# Altium PCB PCB1.PcbDoc
Units mil, origin at the board's own origin, x right, y up, seen from the top; angles counter-clockwise.
Board outline 767.9 x 856.49 mil, 2 copper layers (Top Layer, Bottom Layer), stack 61.756 mil thick; 13 components, 7 nets, 32 pads, 4 vias.
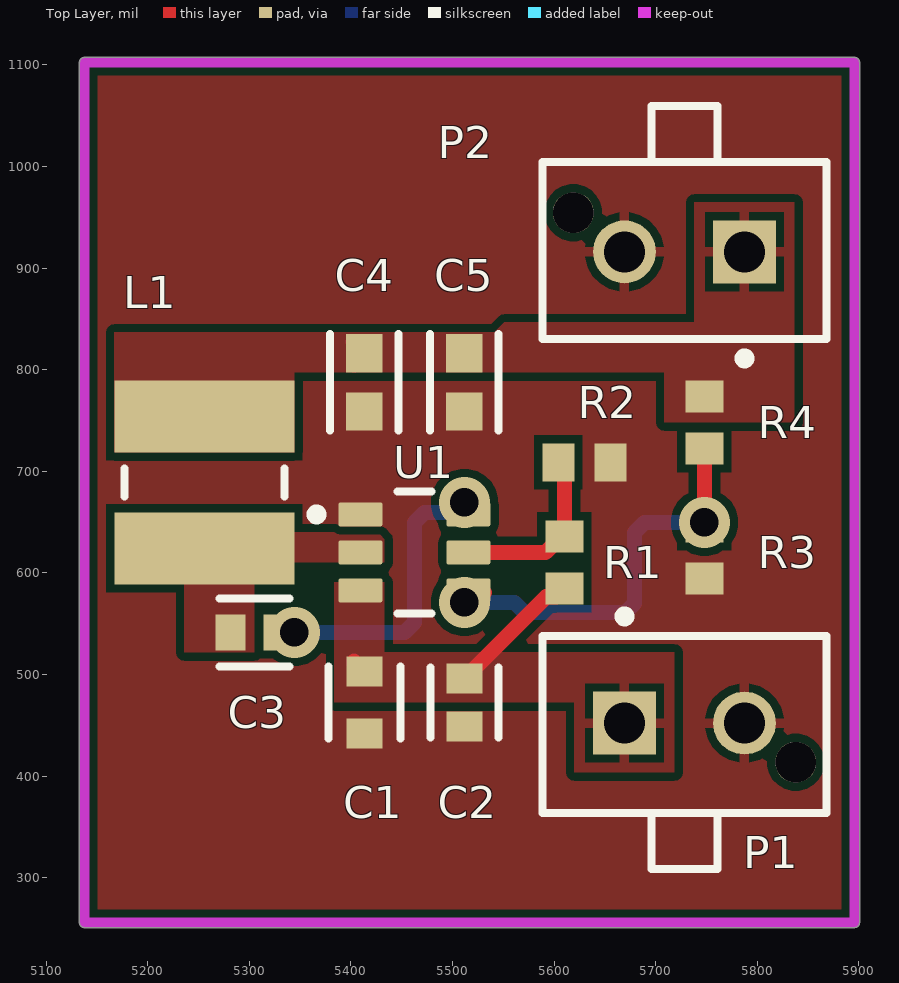
[diagram p0: Top Layer view]
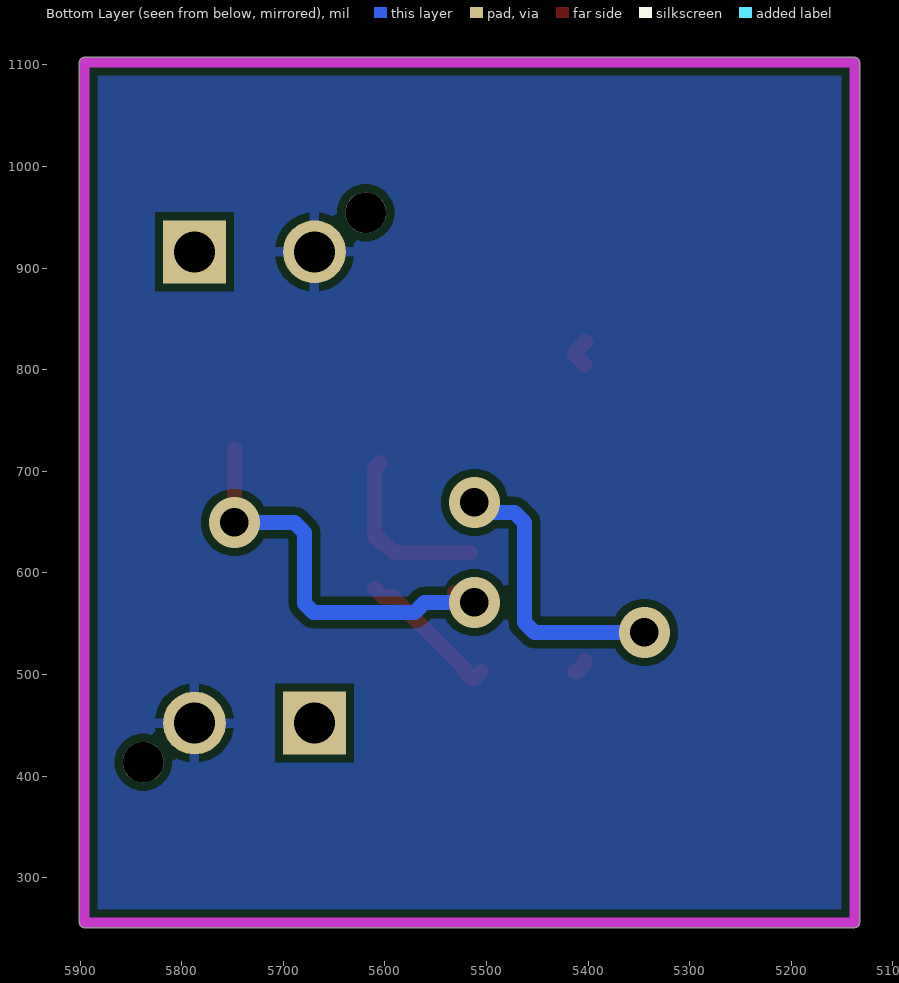
[diagram p1: Bottom Layer view, seen from below]
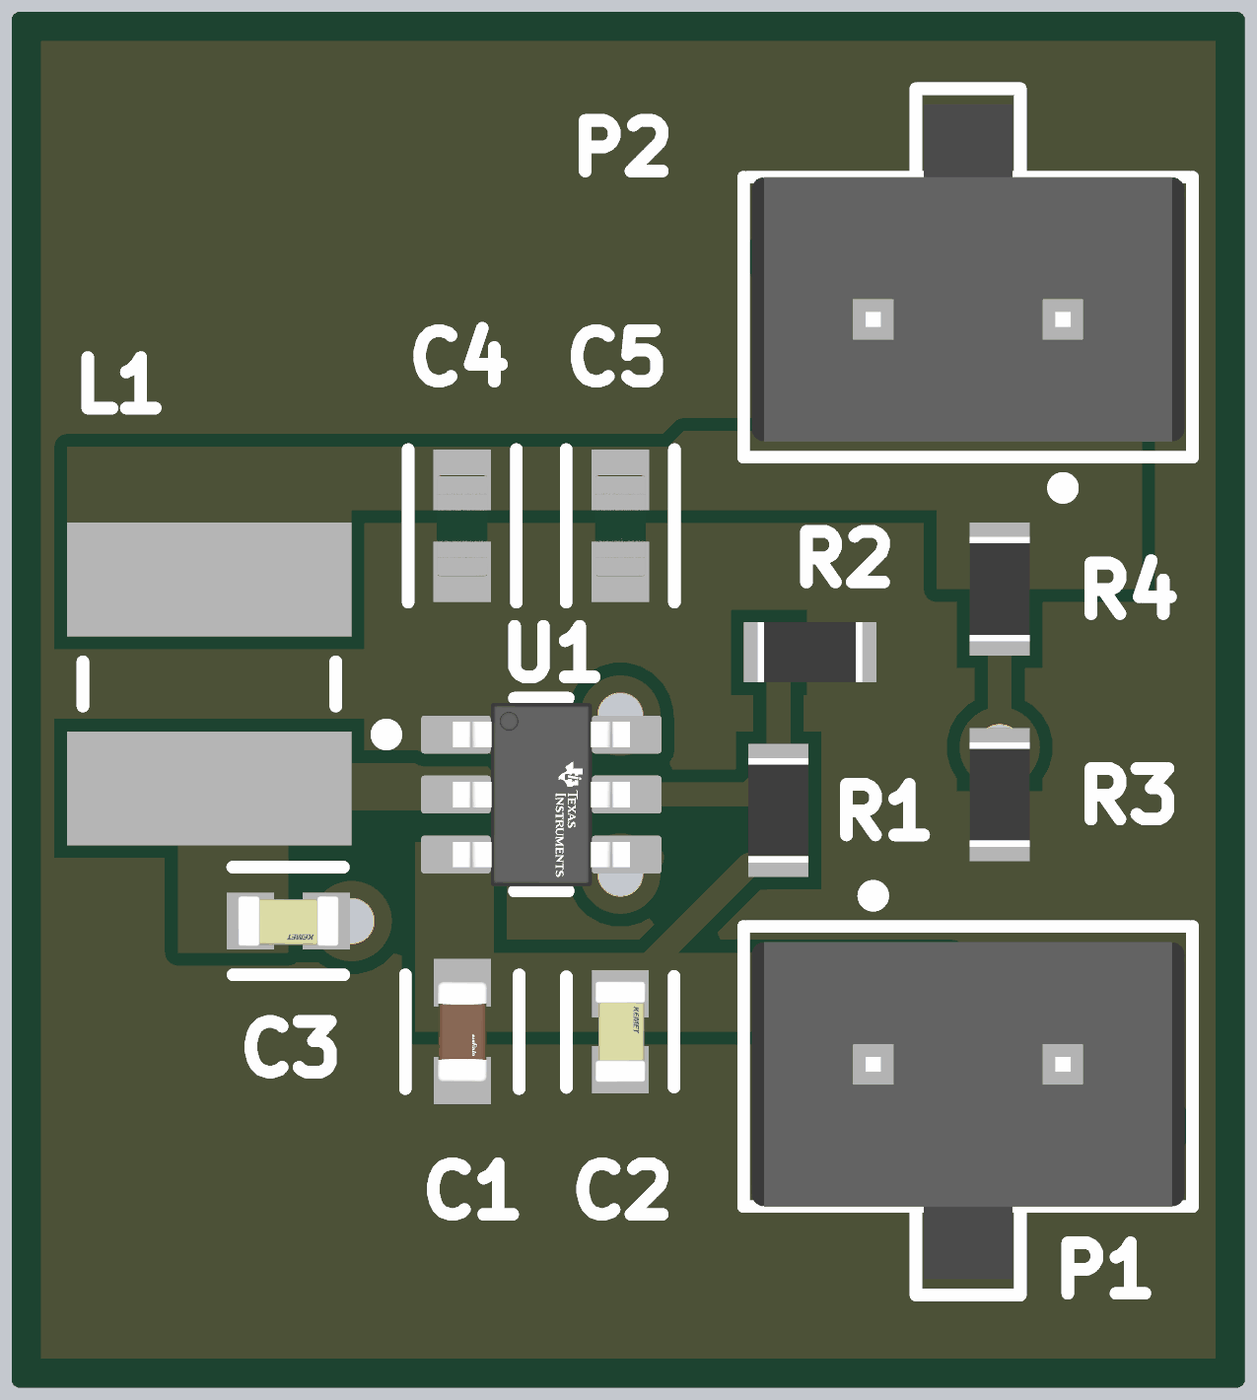
[diagram p2: 3D render of the assembled board from above, using the file's embedded part models]

## Layer stack, top to bottom
Top Solder: solder mask 1, SM-001, Dk 4
Top Layer: signal copper 1.378
Dielectric 1: core 59, Core-043, Dk 4.3
Bottom Layer: signal copper 1.378
Bottom Solder: solder mask 1, SM-001, Dk 4

## Board outline
5132.78,255.91 ccw(c5137.8,255.91) 5137.8,250.89 5895.67,250.89 ccw(c5895.67,255.91) 5900.68,255.91 5900.68,1102.36 ccw(c5895.67,1102.36) 5895.67,1107.38 5137.8,1107.38 ccw(c5137.8,1102.36) 5132.78,1102.36

## Design rules (kind name [scope] priority, off if disabled: settings)
BoardOutlineClearance [All] p1: gap=7.87 ignorepadtopadclearanceinfootprint=FALSE except(15.75: Arc-SplitBarrior Arc-SplitContinuation Track-SplitBarrior Track-SplitContinuation SMDPad-SplitBarrior SMDPad-SplitContinuation THPad-SplitBarrior THPad-SplitContinuation Via-SplitBarrior Via-SplitContinuation Fill-SplitBarrior Fill-SplitContinuation Poly-SplitBarrior Poly-SplitContinuation Region-SplitBarrior Region-SplitContinuation Text-SplitBarrior Text-SplitContinuation)
Clearance [All] p1: gap=3.94 ignorepadtopadclearanceinfootprint=FALSE except(5.91: Arc-Text Track-Text SMDPad-Text THPad-Text Via-Text Fill-Text Poly-Text Region-Text Text-Text; 7.87: Arc-Poly Arc-Hole Track-Poly Track-Hole SMDPad-Poly SMDPad-Hole THPad-Poly THPad-Hole Via-Poly Via-Hole Fill-Poly Fill-Hole Poly-Poly Poly-Hole Region-Hole Text-Hole)
ComponentClearance [All] p1: gap=9.84 collisioncheckmode=3 verticalgap=9.84 showdistances=TRUE donotcheckwithout3dbody=TRUE
DiffPairsRouting [All] p1: maxlimit=8 minlimit=8 mostfreqgap=8 toplayer_minwidth=5.7 toplayer_maxwidth=5.7 toplayer_prefwidth=5.7 bottomlayer_minwidth=5.7 bottomlayer_maxwidth=5.7 bottomlayer_prefwidth=5.7 maxuncoupledlength=500
HoleSize [All] p1: absolutevalues=TRUE maxlimit=248.03 minlimit=7.87 maxpercent=80.000 minpercent=20.000
MinimumAnnularRing MinimumAnnularRingPad [Not(IsVia)] p1: minimumring=9.84
MinimumAnnularRing MinimumAnnularRingVia [IsVia] p2: minimumring=3.94
MinimumSolderMaskSliver [All] p1: minsoldermaskwidth=1.01
PasteMaskExpansion [All] p1: expansion=0 percent=-30.000000
PlaneConnect [All] p1: planeconnectstyle=Direct reliefexpansion=20 reliefentries=4 reliefconductorwidth=10 reliefairgap=10
PolygonConnect PolygonConnect_1 [All] p1: thpad.connectstyle=Relief thpad.reliefconductorwidth=9.84 thpad.reliefentries=4 thpad.polygonreliefangle="90 Angle" thpad.airgapwidth=7.87 smdpad.connectstyle=Direct smdpad.reliefconductorwidth=9.84 smdpad.reliefentries=4 smdpad.polygonreliefangle="90 Angle" smdpad.airgapwidth=7.87 via.connectstyle=Direct via.reliefconductorwidth=20 via.reliefentries=4 via.polygonreliefangle="90 Angle" via.airgapwidth=10
RoutingCorners [All] p1: cornerstyle=Round minsetback=100 maxsetback=100
RoutingVias [All] p1: holewidth=11.81 width=19.68 viastyle="Through Hole" minholewidth=11.81 minwidth=19.68 maxholewidth=248.03 maxwidth=393.7
SilkToSilkClearance [All] p1: silktosilkclearance=3.94
SilkToSolderMaskClearance [IsPad] p1: minsilkscreentomaskgap=5.91 clearancetoexposedcopper=TRUE
SolderMaskExpansion SolderMaskExpansion_1 [IsVia] p1: expansion=4 istentingtop=TRUE
SolderMaskExpansion [All] p2: expansion=0 istentingtop=FALSE
SupplyNets "Schematic Supply Nets_3" [InNet('VOUT')] p1: voltage=0.000
SupplyNets "Schematic Supply Nets_2" [InNet('VIN')] p2: voltage=0.000
SupplyNets "Schematic Supply Nets_1" [InNet('GND')] p3: voltage=0.000
Width [All] p1: maxlimit=393.7 minlimit=3.94 preferedwidth=5.91
21 further rules are at their usual default settings.

## Components (designator, comment, footprint, x,y, rotation, side; value= is the part's Value field where it differs from the comment)
C1 "10μF" FP-GRM188-0_2-MFG 5413.39,472.44 r270 top
C2 "0.1μF" FP-C0603C-CF-MFG 5511.81,472.44 r270 top value="0.10 μF"
C3 "0.1μF" FP-C0603C-CF-MFG 5305.12,541.34 r180 top value="0.10 μF"
C4 "22μF" FP-CL10-IPC_B 5413.39,787.4 r270 top
C5 "22μF" FP-CL10-IPC_B 5511.81,787.4 r270 top
L1 "SDR0403-3R3ML" BOUR-SDR0403-2_V 5255.91,688.98 r90 top
P1 "216571-1002" FP-216571-1002-MFG 5728.35,423.23 r180 top
P2 "216571-1002" FP-216571-1002-MFG 5728.35,944.88 r0 top
R1 "47kΩ" RESC1609X50X30NL8T20 5610.24,610.24 r270 top
R2 "10kΩ" RESC1609X50X30NL8T20 5629.92,708.66 r180 top
R3 "10kΩ" RESC1609X50X30NL8T20 5748.03,620.08 r90 top
R4 "54.9kΩ" RESC1609X50X30NL8T20 5748.03,748.03 r270 top
U1 "TPS563208DDCR" FP-DDC0006A-MFG 5462.6,620.08 r0 top

## Footprints (in the part's own frame and the unit in brackets; to place one, negate y for a bottom-side part, rotate by r counter-clockwise, add the part's x,y. Pads: shape width x height; smd on the part's side, far side on the other; paste and mask are expansions set on the pad)
BOUR-SDR0403-2_V [mm] "SMD, 2-Leads, Dia 4.5mm, Height 3.5mm"
  rect 1.8x4.5 smd: 1(-1.65,0) 2(1.65,0)
  silkscreen extent -0.35,-2 0.35,2, body extent -2.25,-2 2.25,2, height 3.5
FP-216571-1002-MFG [mm]
  rect 1.57x1.57 hole 1.02 paste-2539.97 mask+0: 1(1.5,-0.735)
  round 1.57 hole 1.02 paste-2539.97 mask+0: 2(-1.5,-0.735)
  round 1.02 hole 1.02 unplated paste-2539.97 mask+0: ""(-2.78,0.245)
  silkscreen extent -3.55,-3.52 3.55,2.92, body extent -3.65,-3.02 3.65,3.02, height 0.25
FP-C0603C-CF-MFG [mm]
  rect 0.75x0.9 smd paste+0 mask+0: 1(-0.6,0) 2(0.6,0)
  silkscreen extent -0.87,-0.85 0.88,0.85, body extent -1.2,-0.6 1.2,0.6, height 0.25
FP-CL10-IPC_B [mil]
  rect 37.72x35.91 smd paste+0 mask+0: 1(-28.62,0) 2(28.62,0)
  silkscreen extent -47,-34 47,34, body extent -57,-28 57,28, height 10
FP-DDC0006A-MFG [mm]
  rrect17% 1.1x0.6 smd paste+0 mask+0: 1(-1.35,0.95) 2(-1.35,0) 3(-1.35,-0.95) 4(1.35,-0.95) 5(1.35,0) 6(1.35,0.95)
  silkscreen extent -2.57,-1.53 0.42,1.53, body extent -2,-1.63 2,1.63, height 0.25
FP-GRM188-0_2-MFG [mm]
  rect 0.75x0.9 smd paste+0 mask+0: 1(-0.775,0) 2(0.775,0)
  silkscreen extent -0.9,-0.9 0.9,0.9, body extent -1.25,-0.6 1.25,0.6, height 0.25
RESC1609X50X30NL8T20 [mm] "Chip Resistor, 2-Leads, Body 1.65x0.95mm, IPC Medium Density"
  rect 0.8x0.95 smd: 1(-0.65,0) 2(0.65,0)
  body extent -0.82,-0.48 0.82,0.48, height 0.5

## Part data
C1: library part CMP-2006-02520-2, "Chip Multilayer Ceramic Capacitors for General Purpose, 0603, 10uF, X5R, 15%, 20%, 25V", Case Code (Imperial)=0603, Case Code (Metric)=1608, Dielectric=X5R, Max Operating Temperature=85°C, Min Operating Temperature=-55°C, Package Quantity=1, Resistor Type=Ceramic, Tolerance=20%, Voltage=25V, Case/Package=0603, Depth=0.8mm, Height=0.8mm, Lead Free="Lead Free", Length=1.6mm, Mount="Surface Mount", Number of Pins=2, Packaging="Tape and Reel", REACH SVHC="No SVHC", Termination=SMD/SMT, Thickness=0.031inch, Voltage Rating=25V, Voltage Rating (DC)=25V, Weight=0.000222oz, Width=0.031inch
C2 C3: library part CMP-2006-03057-2, "CAP CER 0.1UF 25V X7R 0603", Capacitance="0.10 μF", Manufacturer=KEMET, Manufacturer Part Number=C0603C104K3RACTU, Package=C0603C-CF, Temperature="-55°C to +125°C", Temperature Characteristic=X7R, Temperature Coefficient=30ppm/°C, Temperature Range High=+125°C, Temperature Range Low=-55°C, Tolerance=10%, Voltage Rating="25 V", Automotive=Yes, Automotive Grade="Grade 1", Category=Cap, ComponentLink2Description=Datasheet, ComponentLink2URL=https://api.kemet.com/component-edge/download/datasheet/C0603C100J5GACAUTO.pdf, Device Class L1="Passive Components", Device Class L2=Capacitors, Device Class L3="Ceramic Capacitors", Digikey Description="CAP CER 0.1UF 25V X7R 0603", Height=0.87mm, Lead Free=Yes, Material=Ceramic, Mouser Description="Multilayer Ceramic Capacitors MLCC - SMD/SMT 25volts 0.1uF X7R 10%", Octopart=https://octopart.com/c0603c104k3ractu-kemet-127541, RoHS=TRUE
C4 C5: library part CMP-13271-002755-1, "Cap Ceramic 22uF 16V X5R ±20% Pad SMD 0603 +85°C T/R", Capacitance=22uF, Case Code (Imperial)=0603, Case Code (Metric)=1608, Max Operating Temperature=85°C, Min Operating Temperature=-55°C, Temperature Characteristic=X5R, Tolerance=20%, Voltage Rating=16V, Case/Package=0603, Mount="Surface Mount", Packaging="Tape and Reel"
L1: library part CMP-0904-00015-1, "SDR0403 Series Power Inductor, 3.3 uF +/- 20 %, 0.058 Ohm, -40 to 125 degC, 2-Pin SMD, RoHS, Tape and Reel", Inductance (uH)=3.3, Manufacturer=Bourns, Temperature Range="-40 to 125 degC", Test Frequency (MHz)=7.96, Tolerance (%)="+/- 20", ComponentLink1Description="Manufacturer URL", ComponentLink1URL=http://www.bourns.com/, ComponentLink2Description=Datasheet, ComponentLink2URL=http://www.bourns.com/data/global/pdfs/sdr0403.pdf, DatasheetVersion=Feb-12, I rms (A)="2.15 Max.", I sat (A)="3 Typ.", Mounting Technology="Surface Mount", PackageDescription="3-Pin SMD, Dia 4.5 mm, Height 3.5 mm", PackageReference=SDR0403-2, Packing="Tape and Reel", PartNumber=SDR0403-3R3ML, Q=28, RDC (Ohm)="0.058 Max.", RoHS=TRUE, SRF (MHz)="65 Min."
P1 P2: library part CMP-04776-000677-1, "MICRO-FIT PLUS SR VT HDR ASSY TI"
R1 R4: library part CMP-1666-00005-4, "Chip Resistor, 10 KOhm, +/- 1%, 100 mW, -55 to 155 degC, 0603 (1608 Metric), RoHS, Tape and Reel", Manufacturer="Vishay Semiconductor", Max Operating Temperature="155 degC", Min Operating Temperature="-55 degC", Package Quantity=5000, Power=100mW, Tolerance=1%, Voltage Rating="75 V", ComponentLink1Description="Manufacturer URL", ComponentLink1URL=http://www.vishay.com/, ComponentLink2Description=Datasheet, ComponentLink2URL=https://datasheet.ciiva.com/11809/0900766b80d98afc-11809037.pdf, DatasheetVersion=06/2012, Height="0.45 mm", Length="1.55 mm", Mounting Technology="Surface Mount", PackageDescription="2-Pin Surface Mount Device, Body 1.575 x 0.85 mm", PackageReference=0603, Packaging="Tape and Reel", REACH SVHC=Unknown, RoHSCompliant=true
R2 R3: library part CMP-1666-00005-4, "Chip Resistor, 10 KOhm, +/- 1%, 100 mW, -55 to 155 degC, 0603 (1608 Metric), RoHS, Tape and Reel", Manufacturer="Vishay Semiconductor", Max Operating Temperature="155 degC", Min Operating Temperature="-55 degC", Package Quantity=5000, Power=125mW, Tolerance=1%, Voltage Rating="75 V", ComponentLink1Description="Manufacturer URL", ComponentLink1URL=http://www.vishay.com/, ComponentLink2Description=Datasheet, ComponentLink2URL=https://datasheet.ciiva.com/11809/0900766b80d98afc-11809037.pdf, DatasheetVersion=06/2012, Height="0.45 mm", Length="1.55 mm", Mounting Technology="Surface Mount", PackageDescription="2-Pin Surface Mount Device, Body 1.575 x 0.85 mm", PackageReference=0603, Packaging="Tape and Reel", REACH SVHC=Unknown, RoHSCompliant=true
U1: library part CMP-04918-000356-1, "IC REG BUCK ADJ 3A TSOT23-6", Case/Package=SOT-23-6, Max Input Voltage=17V, Max Operating Temperature=125°C, Max Output Voltage=7V, Min Input Voltage=4.5V, Min Operating Temperature=-40°C, Min Output Voltage=768mV, Output Current=3A, Quiescent Current=400uA, Switching Frequency=580kHz, Lead Free="Lead Free", Mount="Surface Mount", Number of Outputs=1, Output Configuration=Positive, Output Type=Adjustable, Packaging="Tape and Reel", RoHS Compliant=Yes, Synchronous Rectifier=Yes

## Via types
v1: diameter 50, hole 28, Top Layer to Bottom Layer, tented both sides, 4 vias

## Nets (pads, with @x,y where several pads share a name; then routed paths per layer and width w, separated by ;. In a path a pad name is that pad's centre, name@x,y a point inside that pad or via, vN(x,y) a via of type N, cw(c..) or ccw(c..) an arc to the next point about the centre after c; other vN are vias at no path point)
GND: C1.2 C2.2 C4.2 C5.2 P1.2 P2.2 R2.1 R3.1 U1.1
NetC3_2: C3.2 L1.1 U1.2
NetR1_1: R1.1 R2.2 U1.5 | length 184.6
  Top Layer w15: U1.5 5591.54,620.08 5607.28,635.83 R1.1 ; R1.1@5604.33,629.92 R1.1 ; R2.2 5610.24,702.76 R1.1
NetR3_2: R3.2 R4.2 U1.4 | length 440.6
  Top Layer w15: v1(5511.81,570.87) 5521.28,570.87 U1.4@5531.12,580.71 ; U1.4 5517.72,580.71 U1.4@5531.12,580.71 ; U1.4@5531.5,580.71 U1.4@5531.12,580.71 ; R3.2@5748.03,639.76 R3.2 v1(5748.03,649.61) R4.2
  Bottom Layer w15: v1(5511.81,570.87) 5561.02,570.87 5570.87,561.02 5670.35,561.02 5679.13,569.81 5679.13,639.76 5688.98,649.61 v1(5748.03,649.61)
VBST: C3.1 U1.6 | length 293.7
  Top Layer w15: C3.1 v1(5344.49,541.34)
  Bottom Layer w15: v1(5344.49,541.34) 5452.76,541.34 5462.6,551.18 5462.6,649.61 5472.44,659.45 5501.97,659.45 v1(5511.81,669.29)
VIN: C1.1 C2.1 P1.1 R1.2 U1.3 | length 162.8
  Top Layer w15: C1.1@5403.17,513.17 5403.17,510.22 5410.43,502.95 C1.1 ; C2.1@5504.92,502.95 C2.1 5514.76,496.06 5522.03,503.33 5522.03,506.28 5592.15,576.4 5601.99,576.4 R1.2
VOUT: C4.1 C5.1 L1.2 P2.1 R4.1 | length 38
  Top Layer w15: C4.1@5402.02,827.38 5402.93,827.38 5413.39,816.93 C4.1 5413.39,815.12 C4.1@5402.93,804.66 ; P2.1@5783.4,919.95 P2.1
pads on no net: P1. P2.

## Polygon pours and split planes (outlines as drawn)
GND on Top Layer "GND_L01_P009" (solid, remove dead copper, pour order 9): 5132.78,255.91 ccw(c5137.8,255.91) 5137.8,250.89 5895.67,250.89 ccw(c5895.67,255.91) 5900.68,255.91 5900.68,1102.36 ccw(c5895.67,1102.36) 5895.67,1107.38 5137.8,1107.38 ccw(c5137.8,1102.36) 5132.78,1102.36
NetC3_2 on Top Layer "NONET_L-01_P-001" (solid, remove dead copper, pour order 0): 5305.12,521.65 5236.22,521.65 5236.22,639.76 5433.07,639.76 5433.07,610.24 5305.12,610.24
VIN on Top Layer "NONET_L-01_P-001" (solid, remove dead copper, pour order 1): 5383.86,590.55 5383.86,472.44 5620.08,472.44 5620.08,403.54 5718.5,403.54 5718.5,521.65 5433.07,521.65 5433.07,590.55
VOUT on Top Layer "NONET_L-01_P-001" (solid, remove dead copper, pour order 2): 5344.49,718.5 5167.32,718.5 5167.32,836.61 5541.34,836.61 5551.18,846.46 5738.19,846.46 5738.19,964.57 5836.61,964.57 5836.61,748.03 5708.66,748.03 5708.66,797.24 5344.49,797.24
GND on Bottom Layer "GND_L02_P008" (solid, remove dead copper, pour order 8): 5132.78,255.91 ccw(c5137.8,255.91) 5137.8,250.89 5895.67,250.89 ccw(c5895.67,255.91) 5900.68,255.91 5900.68,1102.36 ccw(c5895.67,1102.36) 5895.67,1107.38 5137.8,1107.38 ccw(c5137.8,1102.36) 5132.78,1102.36

## Keep-outs
Keep-Out Layer:
  lines w10: 5137.8,255.91 5137.8,1102.36 5895.67,1102.36 5895.67,255.91 5137.8,255.91